# EAGLE board 3 Axis Fan(1) (EAGLE 9.7.0)

Size 87.86 x 200.85 mm. Coordinates in mm from the lower left corner, seen from the top.
Outline: 0,0 87.86,0 87.86,200.85 0,200.85 0,0
Copper layers (1*16): Top 0.035mm / dielectric 1.5mm / Bottom 0.035mm
Design rules "default": minimum track width 6mil, minimum drill 0.35mm, track to track 6mil, track to pad 6mil, pad to pad 6mil, via to via 6mil, smd to smd 6mil, copper to edge 40mil, drill to drill 6mil, minimum pad ring 10mil, minimum via ring 8mil, stop-mask expansion 4mil, vias tented up to drill 0mil, thermal gap 10mil

## Footprints (pad centres in the part's own frame; a part is rotated, then mirrored left to right if it is on the bottom)
BATTERY-GENERIC = drill 1.118 pad 3.15 octagon: + 2.54,0; - -2.54,0
CAP-THRU-2.54MM = drill 1.016 pad 1.88: 1 -1.27,0; 2 1.27,0
MOTOR = drill 1.118 pad 3.15 octagon: + 2.54,0; - -2.54,0
RESAD1016W63L850D250B = drill 0.83 pad 1.43: 1 -5.08,0; 2 5.08,0
SWITCH-MOMENTARY-PTH-6.5MM = drill 1.016 pad 1.88: 1 -3.251,2.261; 2 3.251,2.261; 3 -3.251,-2.261; 4 3.251,-2.261
SWITCH-SPDT-PTH-8.5X3.7MM = drill 1.016 pad 1.88: 1 -2.54,0; 2 0,0; 3 2.54,0
SG90 = drill 1.016 long: 1 -2.54,0; 2 0,0; 3 2.54,0
ARDUINO-UNO-R3-SHIELD = drill 1.016 pad 1.88: 3.3V 24.13,-2.54; 5V 24.13,0; A0 24.13,12.7; A1 24.13,15.24; A2 24.13,17.78; A3 24.13,20.32; A4 24.13,22.86; A5 24.13,25.4; AREF -24.13,-13.97; D2 -24.13,20.32; D3 -24.13,17.78; D4 -24.13,15.24; D5 -24.13,12.7; D6 -24.13,10.16; D7 -24.13,7.62; D8 -24.13,3.81; D9 -24.13,1.27; D10 -24.13,-1.27; D11 -24.13,-3.81; D12 -24.13,-6.35; D13 -24.13,-8.89; GND@0 24.13,2.54; GND@1 24.13,5.08; GND@2 -24.13,-11.43; IOREF 24.13,-7.62; NC 24.13,-10.16; RES 24.13,-5.08; RX -24.13,25.4; SCL -24.13,-19.05; SDA -24.13,-16.51; TX -24.13,22.86; VIN 24.13,7.62

## Placement (x,y rotation side)
BAT1  6V  [BATTERY-GENERIC]  19.99,192.59 180 top
C2  100n  [CAP-THRU-2.54MM]  5.97,135.34 90 top
C3  100n  [CAP-THRU-2.54MM]  54.23,168.36 90 top
M1  MOTOR_HDR  [MOTOR]  79.6,167.06 270 top
R1  10k  [RESAD1016W63L850D250B]  36.45,141.69 90 top
R2  10k  [RESAD1016W63L850D250B]  21.21,141.69 90 top
R3  220  [RESAD1016W63L850D250B]  56.77,177.25 90 top
S1  SWITCH_MOMENTARY  [SWITCH-MOMENTARY-PTH-6.5MM]  23.75,158.2 90 top
S2  SWITCH_MOMENTARY  [SWITCH-MOMENTARY-PTH-6.5MM]  33.91,158.2 90 top
S3  TOGGLE  [SWITCH-SPDT-PTH-8.5X3.7MM]  54.23,162.01 180 top
SERVO2  SERVOSG90  [SG90]  15.28,126.06 0 top
U2  ARDUINO-UNO-R3-SHIELD  [ARDUINO-UNO-R3-SHIELD]  29.87,34.52 180 top

## Library data of the parts
BAT1 C2 C3 M1 R1-R3 S1-S3 SERVO2 U2 = Tinkercad

## Nets
BAT1+: BAT1.+ C2.1 C3.1 C3.2 M1.+ S3.2 SERVO2.2 U2.5V U2.VIN
BAT1-: BAT1.- C2.2 R1.1 R2.1 R3.2 SERVO2.1 U2.GND@0 U2.GND@1 U2.GND@2
M1_-: M1.- R3.1 S3.1
S1_2: R2.2 S1.1 S1.2
S2_3: R1.2 S2.3 S2.4
U2_D11: SERVO2.3 U2.D11
U2_D12: S1.3 S1.4 U2.D12
U2_D13: S2.1 S2.2 U2.D13

## Tracks (layer width: path | path; a pad name or v marks a point on that pad's centre or on a via)
BAT1+  (8 unrouted)
BAT1-  (8 unrouted)
M1_-  (2 unrouted)
S1_2  (2 unrouted)
S2_3  (2 unrouted)
U2_D11  (1 unrouted)
U2_D12  (2 unrouted)
U2_D13  (2 unrouted)